# Altium PCB 20251010_MLCC_Stacking_PCB_Stencil_v2.PcbDoc
Units mm, origin at the board's own origin, x right, y up, seen from the top; angles counter-clockwise.
Board outline 109.22 x 109.22 mm, 2 copper layers (Top Layer, Bottom Layer); 3 components, 0 nets, 0 pads, 0 vias.
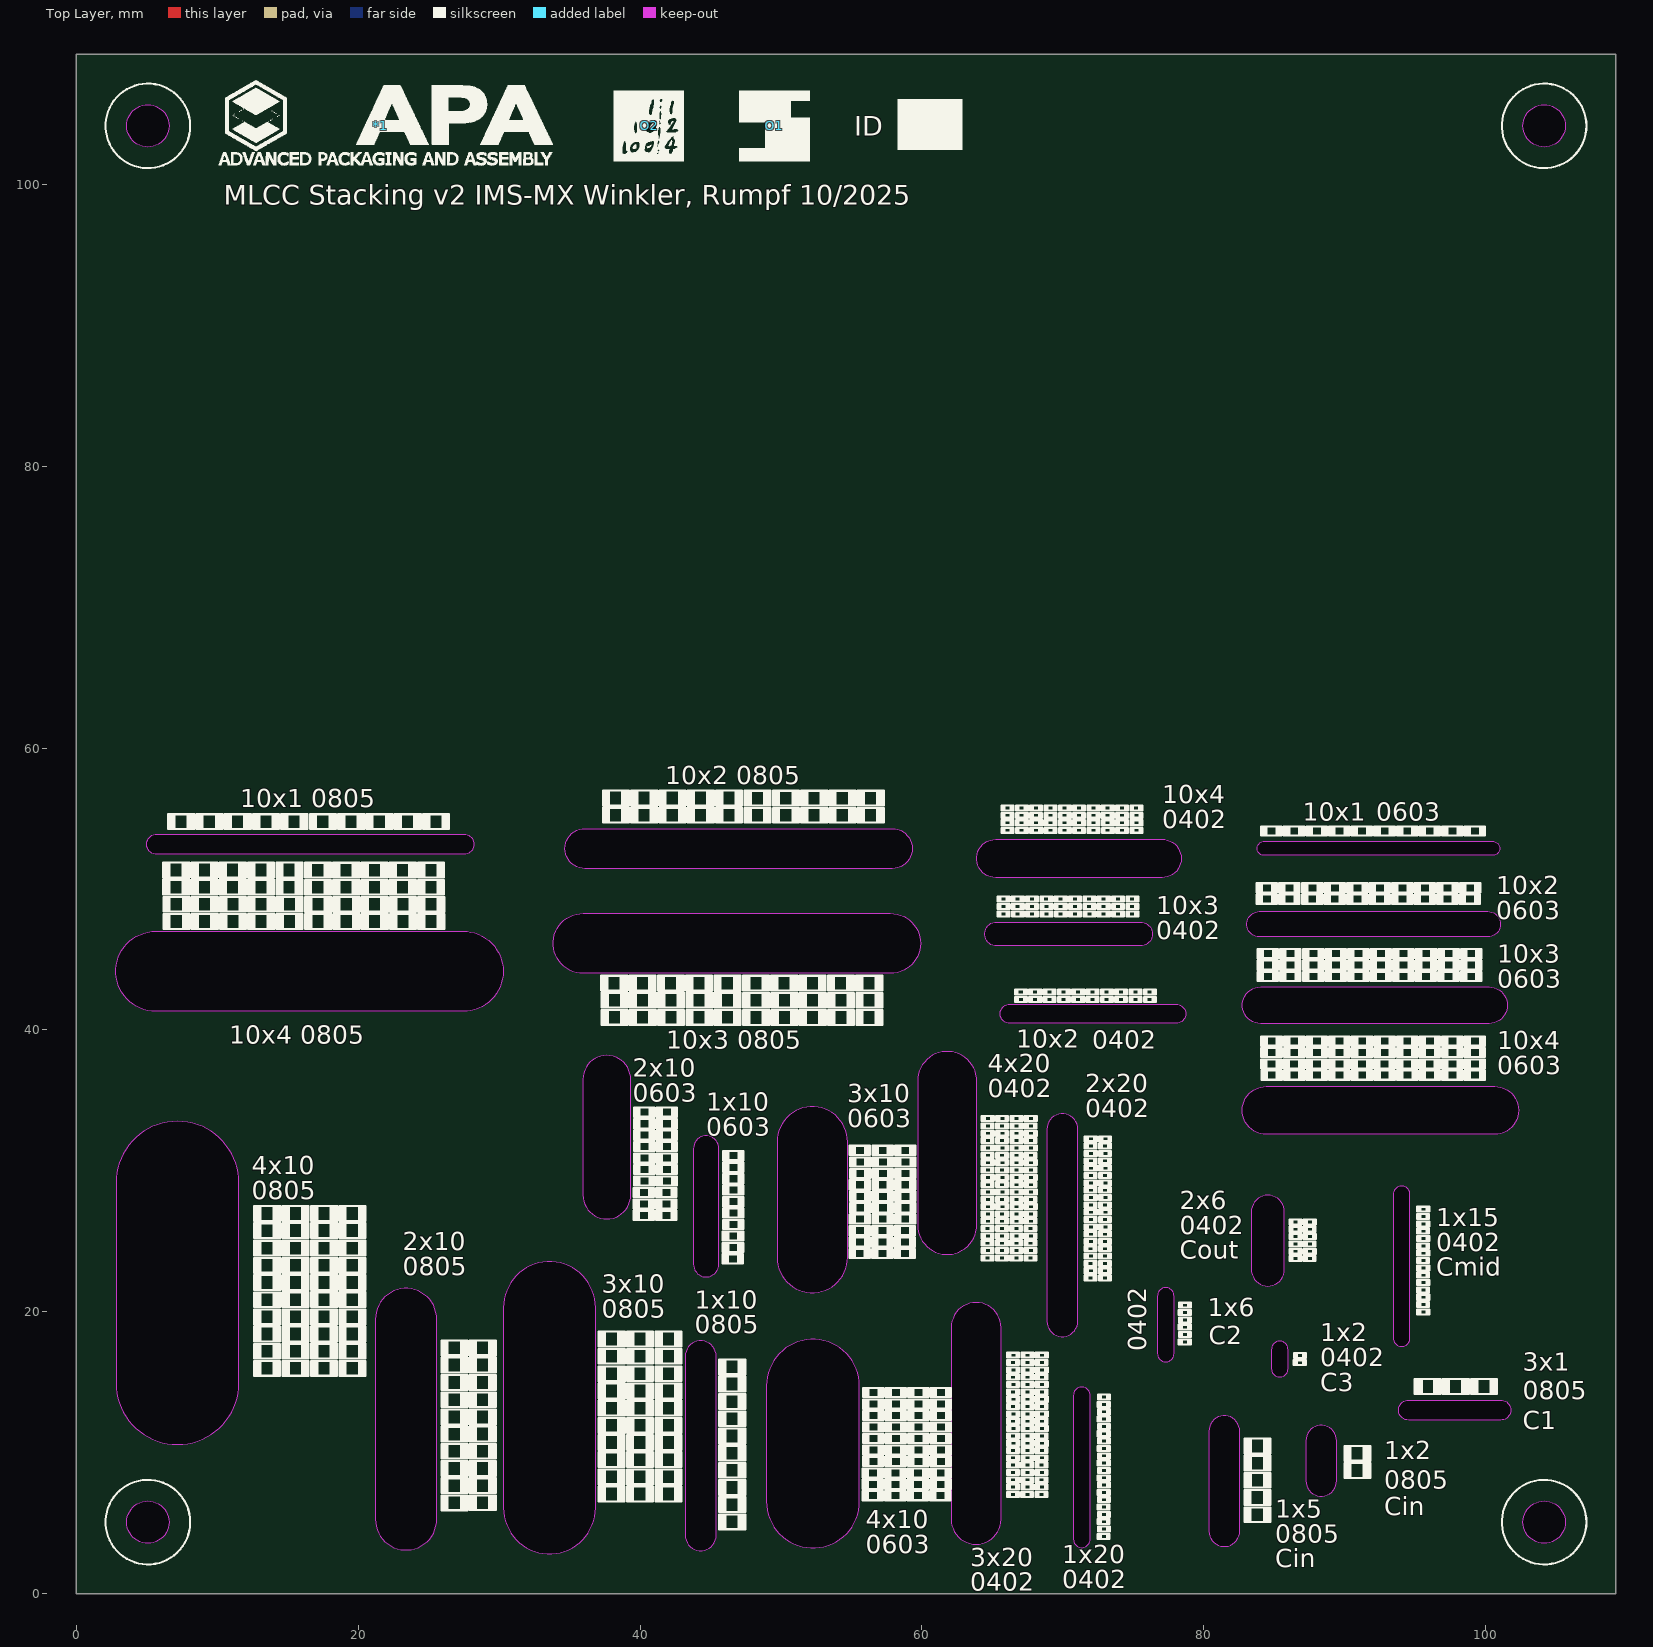
[diagram p0: Top Layer view]
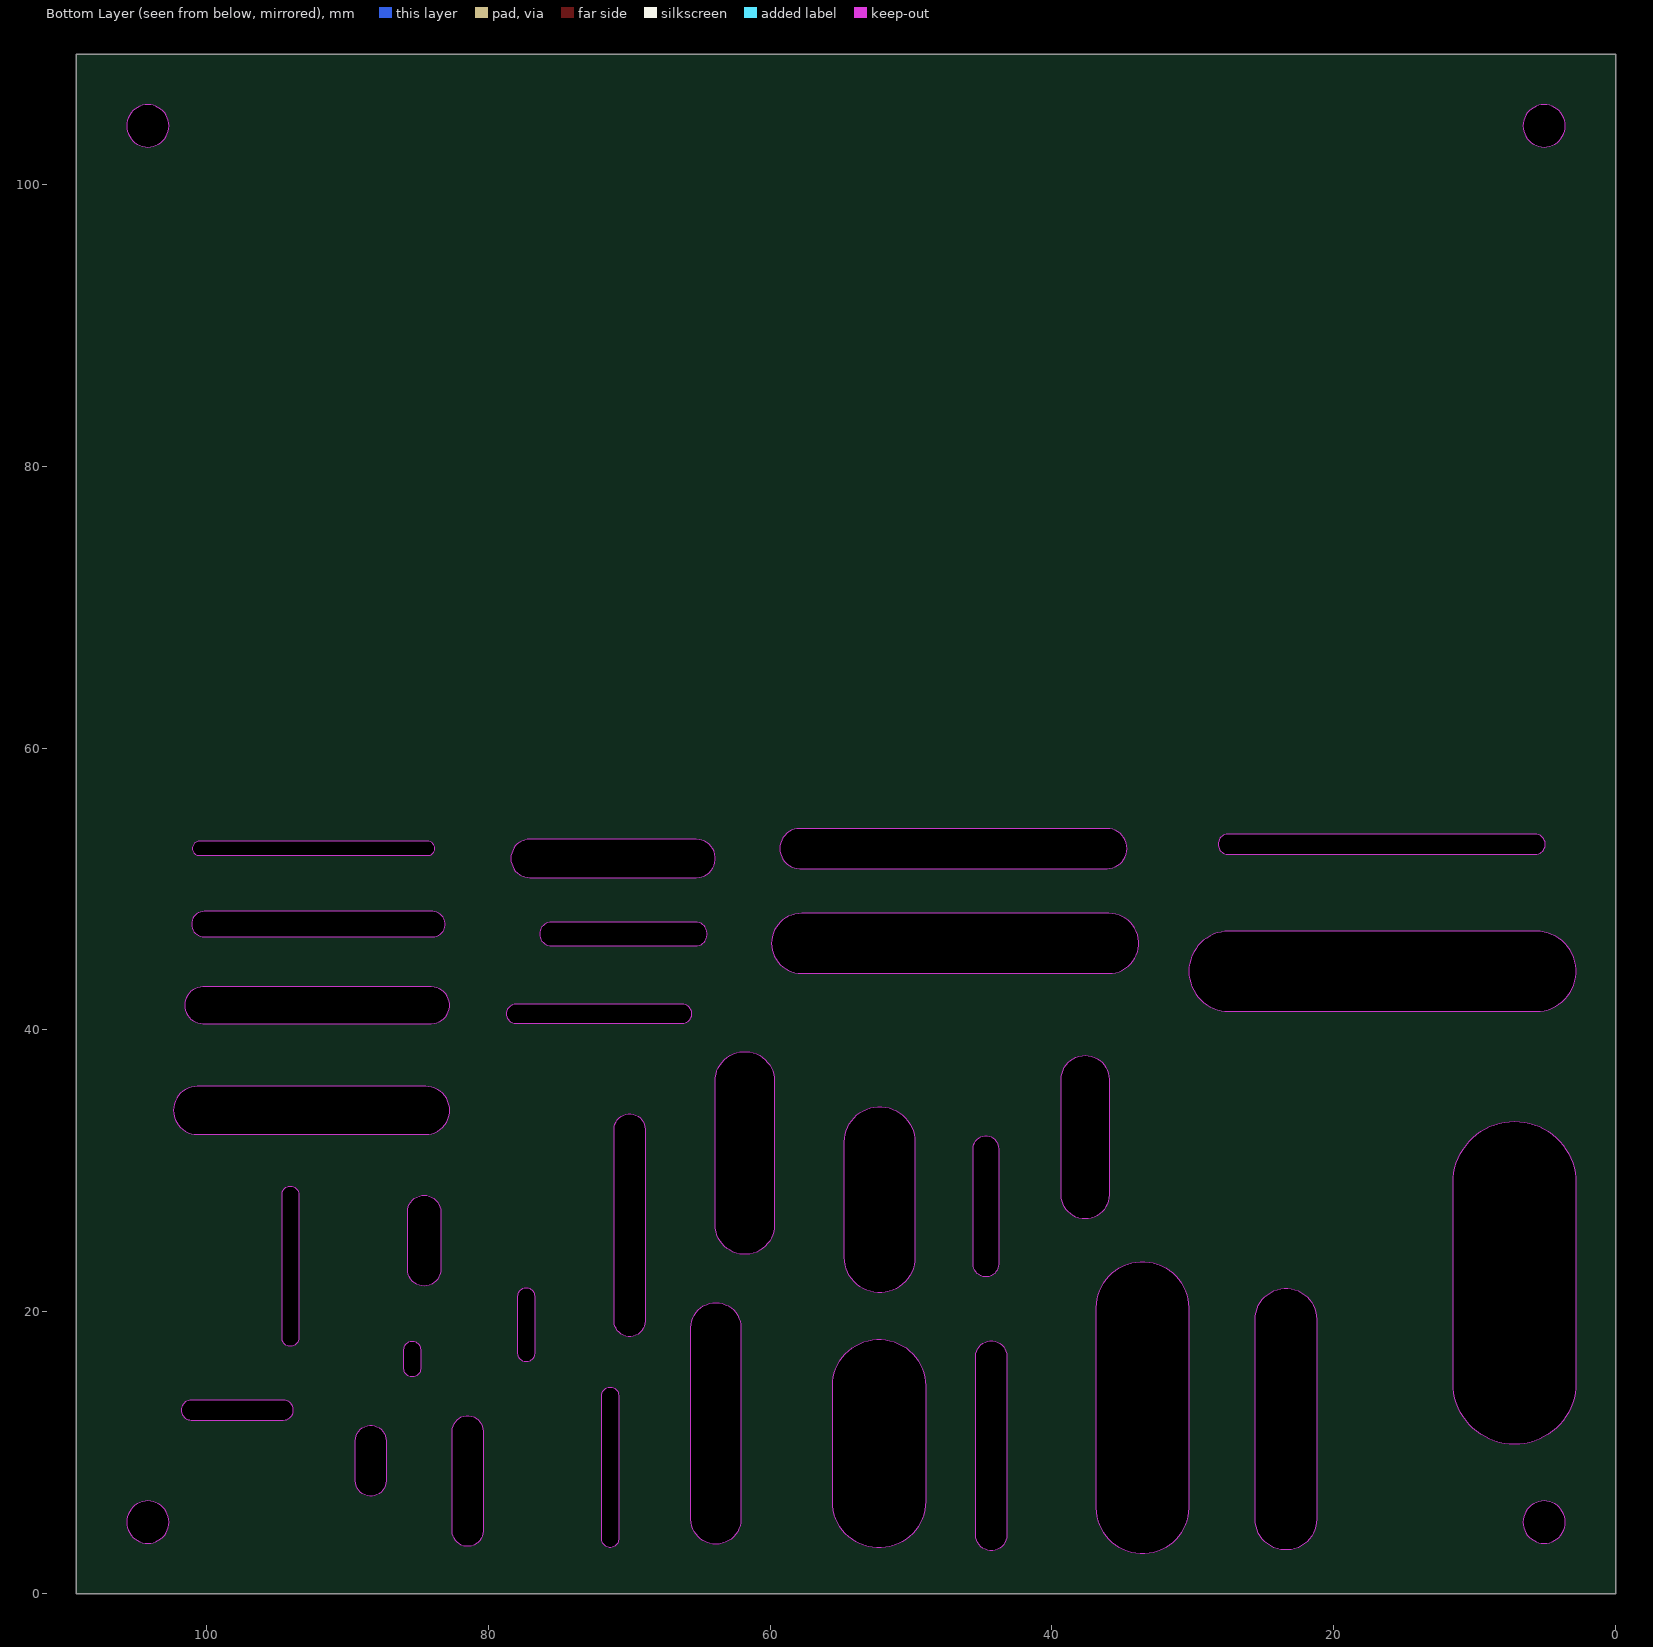
[diagram p1: Bottom Layer view, seen from below]

## Layer stack, top to bottom
Top Solder: solder mask 0.0102, Solder Resist, Dk 3.5
Top Layer: signal copper 0.0356
Dielectric 1: dielectric 0.32, FR-4, Dk 4.8
Bottom Layer: signal copper 0.0356
Bottom Solder: solder mask 0.0102, Solder Resist, Dk 3.5

## Board outline
0,0 0,109.22 109.22,109.22 109.22,0
cut-out: 65.298,45.956 cw(c65.298,46.807) 65.298,47.657 75.498,47.657 cw(c75.498,46.807) 76.349,46.807 cw(c75.498,46.807) 75.498,45.956
cut-out: 66.23,40.465 cw(c66.23,41.145) 66.23,41.826 78.03,41.826 cw(c78.03,41.145) 78.71,41.145 cw(c78.03,41.145) 78.03,40.465
cut-out: 70.749,3.868 ccw(c71.34,3.868) 71.93,3.868 71.93,14.068 ccw(c71.34,14.068) 70.749,14.068
cut-out: 83.357,23.013 ccw(c84.538,23.013) 85.718,23.013 85.718,27.093 ccw(c84.538,27.093) 83.357,27.093
cut-out: 93.44,18.136 ccw(c94.031,18.136) 94.621,18.136 94.621,28.336 ccw(c94.031,28.336) 93.44,28.336
cut-out: 94.521,12.32 cw(c94.521,13.03) 94.521,13.741 101.061,13.741 cw(c101.061,13.03) 101.771,13.03 cw(c101.061,13.03) 101.061,12.32
cut-out: 84.795,15.967 ccw(c85.385,15.967) 85.976,15.967 85.976,17.327 ccw(c85.385,17.327) 84.795,17.327
cut-out: 87.232,8.02 ccw(c88.322,8.02) 89.413,8.02 89.413,10.86 ccw(c88.322,10.86) 87.232,10.86
cut-out: 80.361,4.444 ccw(c81.452,4.444) 82.542,4.444 82.542,11.544 ccw(c81.452,11.544) 80.361,11.544
cut-out: 76.702,17.043 ccw(c77.292,17.043) 77.883,17.043 77.883,21.123 ccw(c77.292,21.123) 76.702,21.123
cut-out: 35.967,44.01 cw(c35.967,46.14) 35.967,48.27 57.767,48.27 cw(c57.767,46.14) 59.897,46.14 cw(c57.767,46.14) 57.767,44.01
cut-out: 36.09,51.443 cw(c36.09,52.864) 36.09,54.284 57.89,54.284 cw(c57.89,52.864) 59.31,52.864 cw(c57.89,52.864) 57.89,51.443
cut-out: 65.231,50.804 cw(c65.231,52.164) 65.231,53.524 77.031,53.524 cw(c77.031,52.164) 78.392,52.164 cw(c77.031,52.164) 77.031,50.804
cut-out: 84.279,52.378 cw(c84.279,52.878) 84.279,53.379 100.479,53.379 cw(c100.479,52.878) 100.98,52.878 cw(c100.479,52.878) 100.479,52.378
cut-out: 83.94,46.603 cw(c83.94,47.503) 83.94,48.404 100.14,48.404 cw(c100.14,47.503) 101.04,47.503 cw(c100.14,47.503) 100.14,46.603
cut-out: 84.028,40.453 cw(c84.028,41.754) 84.028,43.054 100.228,43.054 cw(c100.228,41.754) 101.529,41.754 cw(c100.228,41.754) 100.228,40.453
cut-out: 84.424,32.594 cw(c84.424,34.294) 84.424,35.995 100.624,35.995 cw(c100.624,34.294) 102.324,34.294 cw(c100.624,34.294) 100.624,32.594
cut-out: 59.688,26.171 ccw(c61.789,26.171) 63.889,26.171 63.889,36.371 ccw(c61.789,36.371) 59.688,36.371
cut-out: 35.942,28.296 ccw(c37.643,28.296) 39.343,28.296 39.343,36.496 ccw(c37.643,36.496) 35.942,36.496
cut-out: 68.858,19.346 ccw(c69.958,19.346) 71.059,19.346 71.059,32.946 ccw(c69.958,32.946) 68.858,32.946
cut-out: 62.069,5.284 ccw(c63.84,5.284) 65.61,5.284 65.61,18.884 ccw(c63.84,18.884) 62.069,18.884
cut-out: 5.651,41.319 cw(c5.651,44.159) 5.651,46.999 27.451,46.999 cw(c27.451,44.159) 30.291,44.159 cw(c27.451,44.159) 27.451,41.319
cut-out: 5.706,52.46 cw(c5.706,53.17) 5.706,53.881 27.506,53.881 cw(c27.506,53.17) 28.217,53.17 cw(c27.506,53.17) 27.506,52.46
cut-out: 43.203,4.152 ccw(c44.303,4.152) 45.403,4.152 45.403,16.852 ccw(c44.303,16.852) 43.203,16.852
cut-out: 30.306,6.093 ccw(c33.576,6.093) 36.847,6.093 36.847,20.293 ccw(c33.576,20.293) 30.306,20.293
cut-out: 21.22,5.281 ccw(c23.4,5.281) 25.581,5.281 25.581,19.481 ccw(c23.4,19.481) 21.22,19.481
cut-out: 2.821,14.957 ccw(c7.182,14.957) 11.542,14.957 11.542,29.157 ccw(c7.182,29.157) 2.821,29.157
cut-out: 48.966,6.549 ccw(c52.267,6.549) 55.567,6.549 55.567,14.749 ccw(c52.267,14.749) 48.966,14.749
cut-out: 49.722,23.861 ccw(c52.222,23.861) 54.723,23.861 54.723,32.061 ccw(c52.222,32.061) 49.722,32.061
cut-out: 43.781,23.38 ccw(c44.681,23.38) 45.581,23.38 45.581,31.58 ccw(c44.681,31.58) 43.781,31.58
cut-out: 104.14,3.58 cw(c104.14,5.08) 102.64,5.08 cw(c104.14,5.08) 104.14,6.58 cw(c104.14,5.08) 105.64,5.08 cw(c104.14,5.08)
cut-out: 104.14,102.64 cw(c104.14,104.14) 102.64,104.14 cw(c104.14,104.14) 104.14,105.64 cw(c104.14,104.14) 105.64,104.14 cw(c104.14,104.14)
cut-out: 5.08,102.64 cw(c5.08,104.14) 3.58,104.14 cw(c5.08,104.14) 5.08,105.64 cw(c5.08,104.14) 6.58,104.14 cw(c5.08,104.14)
cut-out: 5.08,3.58 cw(c5.08,5.08) 3.58,5.08 cw(c5.08,5.08) 5.08,6.58 cw(c5.08,5.08) 6.58,5.08 cw(c5.08,5.08)

## Design rules (kind name [scope] priority, off if disabled: settings)
Clearance [All] p1: gap=0.254 ignorepadtopadclearanceinfootprint=FALSE
PolygonConnect [All] p1: connectstyle=Relief reliefconductorwidth=0.254 reliefentries=4 polygonreliefangle="90 Angle" airgapwidth=0.254
RoutingVias [All] p1: holewidth=0.711 width=1.27 viastyle="Through Hole" minholewidth=0.711 minwidth=1.27 maxholewidth=0.711 maxwidth=1.27
SolderMaskExpansion [All] p1: expansion=0.102 istentingtop=FALSE
Width [All] p1: maxlimit=0.254 minlimit=0.254 preferedwidth=0.254
30 further rules are at their usual default settings.

## Components (designator, comment, footprint, x,y, rotation, side; value= is the part's Value field where it differs from the comment)
*1 "CAPA Logo" "CAPA Logo" 21.59,104.14 r0 top
O1 "IMS LOGO" IMS_Logo_5x5mm_Silk 49.53,104.14 r0 top
O2 "LUH Logo" LUH_logo_5x5mm_silk 40.64,104.14 r0 top

## Footprints (in the part's own frame and the unit in brackets; to place one, negate y for a bottom-side part, rotate by r counter-clockwise, add the part's x,y. Pads: shape width x height; smd on the part's side, far side on the other; paste and mask are expansions set on the pad)
"CAPA Logo" [mm]
  silkscreen extent -11.49,-2.81 12.23,3.24
IMS_Logo_5x5mm_Silk [mm]
  silkscreen extent -2.5,-2.5 2.5,2.5
LUH_logo_5x5mm_silk [mm]
  silkscreen extent -2.5,-2.5 2.45,2.5

## Nets (pads, with @x,y where several pads share a name; then routed paths per layer and width w, separated by ;. In a path a pad name is that pad's centre, name@x,y a point inside that pad or via, vN(x,y) a via of type N, cw(c..) or ccw(c..) an arc to the next point about the centre after c; other vN are vias at no path point)

## Polygon pours and split planes (outlines as drawn)
no net on Top Overlay "NONET_L-01_P-001" (solid): 58.281,102.458 62.865,102.458 62.865,106.045 58.281,106.045

## Silkscreen, mask and mechanical layers (free items; w line width, h text height)
Top Overlay:
  drawing of 4414 lines, arcs and shapes, not listed
  text "ID" at 55.201,103.444 h1.4
  text "MLCC Stacking v2 IMS-MX Winkler, Rumpf 10/2025" at 10.46,98.557 h1.4
  text "10x2 0805" at 41.783,57.433 h1.3
  text "10x4" at 77.045,56.067 h1.3
  text "10x1 0805" at 11.628,55.809 h1.3
  text "10x1" at 87.025,54.826 h1.3
  text "0603" at 92.215,54.832 h1.3
  text "0402" at 77.045,54.299 h1.3
  text "10x2" at 100.735,49.611 h1.3
  text "10x3" at 76.604,48.195 h1.3
  text "0603" at 100.735,47.843 h1.3
  text "0402" at 76.604,46.427 h1.3
  text "10x3" at 100.811,44.76 h1.3
  text "0603" at 100.811,42.992 h1.3
  text "10x4 0805" at 10.868,39.037 h1.3
  text "10x2" at 66.68,38.748 h1.3
  text "10x3 0805" at 41.847,38.658 h1.3
  text "0402" at 72.09,38.671 h1.3
  text "10x4" at 100.8,38.621 h1.3
  text "4x20" at 64.664,36.998 h1.3
  text "0603" at 100.8,36.853 h1.3
  text "2x10" at 39.47,36.685 h1.3
  text "2x20" at 71.599,35.582 h1.3
  text "0402" at 64.664,35.23 h1.3
  text "0603" at 39.47,34.917 h1.3
  text "3x10" at 54.71,34.864 h1.3
  text "1x10" at 44.71,34.26 h1.3
  text "0402" at 71.599,33.814 h1.3
  text "0603" at 54.71,33.096 h1.3
  text "0603" at 44.71,32.492 h1.3
  text "4x10" at 12.465,29.748 h1.3
  text "0805" at 12.465,27.98 h1.3
  text "2x6" at 78.304,27.286 h1.3
  text "1x15" at 96.491,26.083 h1.3
  text "0402" at 78.304,25.518 h1.3
  text "2x10" at 23.161,24.378 h1.3
  text "0402" at 96.491,24.315 h1.3
  text "Cout" at 78.304,23.75 h1.3
  text "0805" at 23.161,22.61 h1.3
  text "Cmid" at 96.491,22.547 h1.3
  text "3x10" at 37.285,21.342 h1.3
  text "1x10" at 43.886,20.234 h1.3
  text "1x6" at 80.286,19.682 h1.3
  text "0805" at 37.285,19.574 h1.3
  text "0805" at 43.886,18.466 h1.3
  text "1x2" at 88.27,17.92 h1.3
  text "C2" at 80.337,17.701 h1.3
  text "0402" at 75.898,17.193 h1.3 r90
  text "0402" at 88.27,16.152 h1.3
  text "3x1" at 102.638,15.821 h1.3
  text "C3" at 88.27,14.384 h1.3
  text "0805" at 102.638,13.789 h1.3
  text "C1" at 102.638,11.681 h1.3
  text "1x2" at 92.808,9.547 h1.3
  text "0805" at 92.808,7.439 h1.3
  text "Cin" at 92.808,5.585 h1.3
  text "1x5" at 85.073,5.403 h1.3
  text "4x10" at 55.999,4.649 h1.3
  text "0805" at 85.073,3.635 h1.3
  text "0603" at 55.999,2.881 h1.3
  text "1x20" at 69.963,2.154 h1.3
  text "3x20" at 63.423,1.968 h1.3
  text "Cin" at 85.073,1.867 h1.3
  text "0402" at 69.963,0.386 h1.3
  text "0402" at 63.423,0.2 h1.3
Mechanical 1:
  circle w0.1: c104.14,5.08 r1.5
  circle w0.1: c104.14,104.14 r1.5
  circle w0.1: c5.08,104.14 r1.5
  circle w0.1: c5.08,5.08 r1.5
  lines w1: 84.279,52.878 100.479,52.878
  lines w1.18: 71.34,3.868 71.34,14.068 ; 77.292,17.043 77.292,21.123 ; 85.385,15.967 85.385,17.327 ; 94.031,18.136 94.031,28.336
  lines w1.36: 66.23,41.145 78.03,41.145
  lines w1.42: 5.706,53.17 27.506,53.17 ; 94.521,13.03 101.061,13.03
  lines w1.7: 65.298,46.807 75.498,46.807
  lines w1.8: 44.681,23.38 44.681,31.58 ; 83.94,47.503 100.14,47.503
  lines w2.18: 81.452,4.444 81.452,11.544 ; 88.322,8.02 88.322,10.86
  lines w2.2: 44.303,4.152 44.303,16.852 ; 69.958,19.346 69.958,32.946
  lines w2.36: 84.538,23.013 84.538,27.093
  lines w2.6: 84.028,41.754 100.228,41.754
  lines w2.72: 65.231,52.164 77.031,52.164
  lines w2.84: 36.09,52.864 57.89,52.864
  lines w3.4: 37.643,28.296 37.643,36.496 ; 84.424,34.294 100.624,34.294
  lines w3.54: 63.84,5.284 63.84,18.884
  lines w4.2: 61.789,26.171 61.789,36.371
  lines w4.26: 35.967,46.14 57.767,46.14
  lines w4.36: 23.4,5.281 23.4,19.481
  lines w5: 52.222,23.861 52.222,32.061
  lines w5.68: 5.651,44.159 27.451,44.159
  lines w6.54: 33.576,6.093 33.576,20.293
  lines w6.6: 52.267,6.549 52.267,14.749
  lines w8.72: 7.182,14.957 7.182,29.157